# Altium PCB HONGGAN_拼版.PcbDoc (part 2 of 5)
Units mm, origin at the board's own origin, x right, y up, seen from the top; angles counter-clockwise.
Board outline 106.01 x 72.01 mm, 4 copper layers (Top Layer, Mid-Layer 1, Mid-Layer 2, Bottom Layer); 400 components, 0 nets, 1244 pads, 3211 vias.
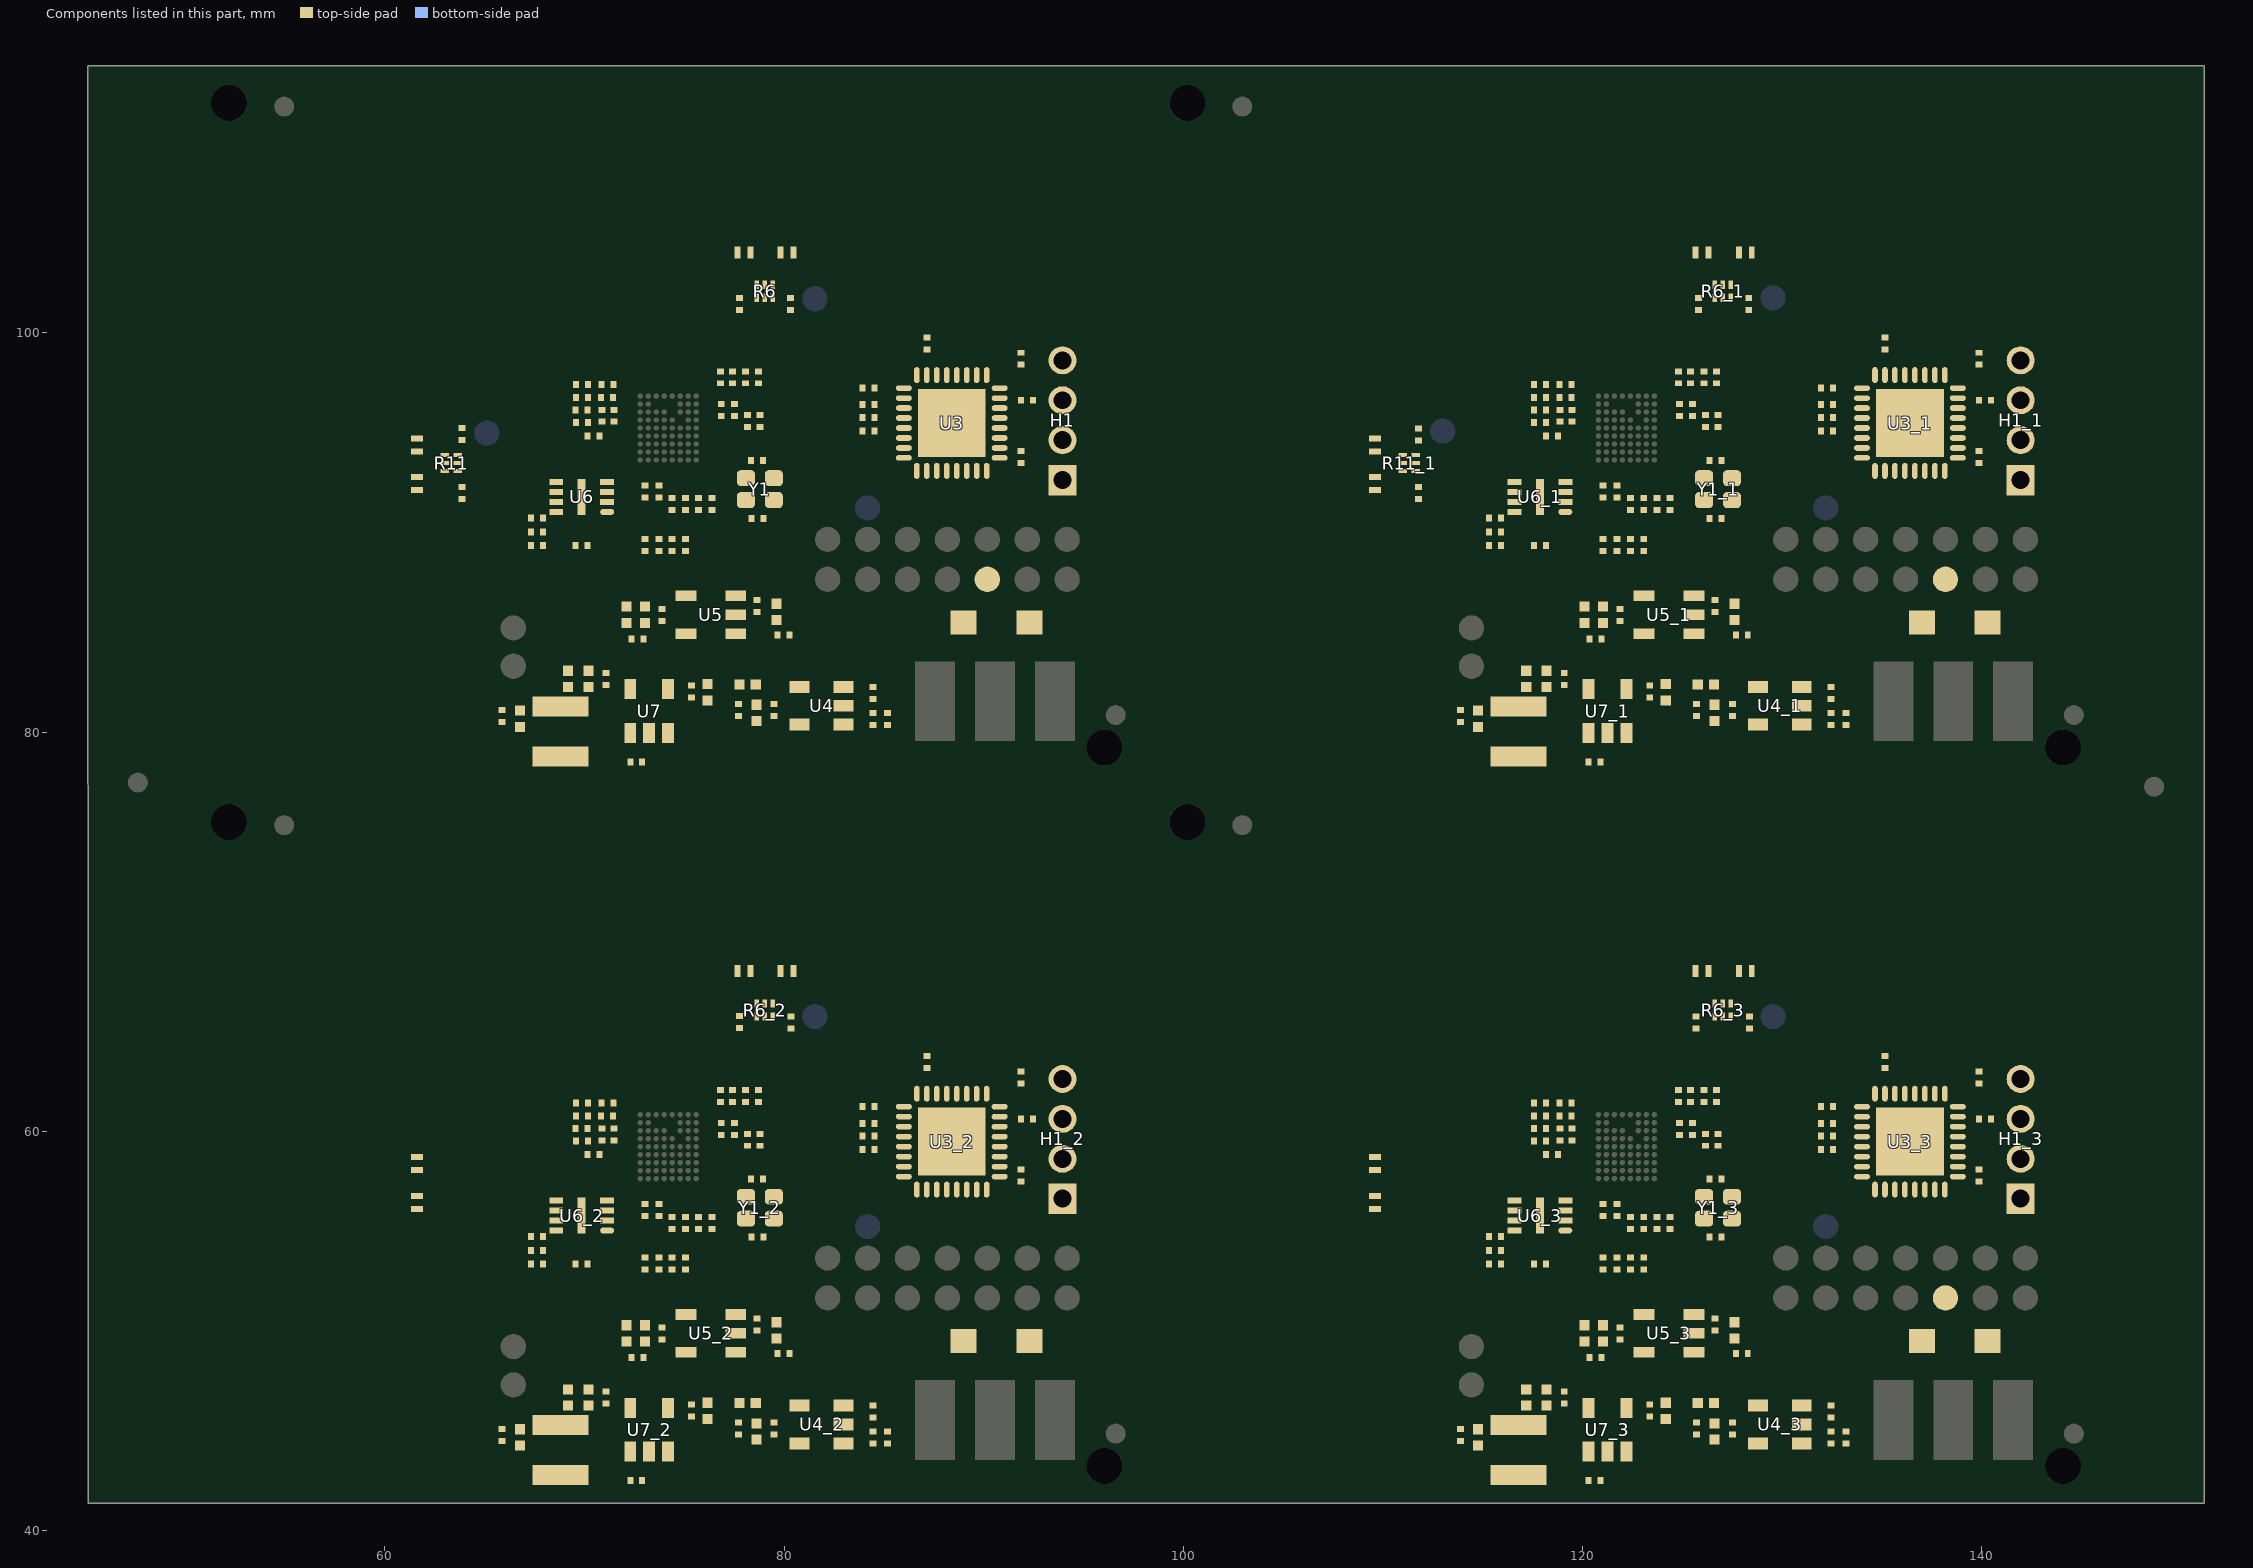
[diagram p4: the components of this part, seen from the top]

## Part data
_1 M_SWCLK M_SWCLK_1 ?: library part 测试点
C1 C1_1 C1_2 C1_3 C2 C2_1 C2_2 C2_3 C3 C3_1 C3_2 C3_3 C4 C4_1 C4_2 C4_3 C5 C5_1 C5_2 C5_3 C6 C6_1 C6_2 C6_3 C7 C7_1 C7_2 C7_3 C8 C8_1 C8_2 C8_3 C9 C9_1 C9_2 C9_3 C10 C10_1 C10_2 C10_3 C11 C11_1 C11_2 C11_3 C12 C12_1 C12_2 C12_3 C13 C13_1 C13_2 C13_3 C14 C14_1 C14_2 C14_3 C15 C15_1 C15_2 C15_3 C16 C16_1 C16_2 C16_3 C17 C17_1 C17_2 C17_3 C18 C18_1 C18_2 C18_3 C19 C19_1 C19_2 C19_3 C20 C20_1 C20_2 C20_3 C21 C21_1 C21_2 C21_3 C22 C22_1 C22_2 C22_3 C23 C23_1 C23_2 C23_3 C24 C24_1 C24_2 C24_3 C25 C25_1 C25_2 C25_3 C26 C26_1 C26_2 C26_3 C27 C27_1 C27_2 C27_3 C28 C28_1 C28_2 C28_3 C29 C29_1 C29_2 C29_3 C34 C34_1 C34_2 C34_3 C35 C35_1 C35_2 C35_3 C36 C36_1 C36_2 C36_3 C37 C37_1 C37_2 C37_3 C38 C38_1 C38_2 C38_3 C39 C39_1 C40 C40_1: library part CAP_0201, Part Name="CAP 0402", Part Number=700011020031, ID=499, Module=0, Part Type=MLCC\SMT\0402\X5R\16V, Priority=S, Process=SMT, Specification=spec
C30 C30_1 C30_2 C30_3 C31 C31_1 C31_2 C31_3: library part CAP_0201, "贴片电容 0201", Part Name="CAP 0402", Part Number=700011020031, ID=499, Module=0, Part Type=MLCC\SMT\0402\X5R\16V, Priority=S, Process=SMT, Specification=spec
C32 C32_1 C32_2 C32_3 C33 C33_1 C33_2 C33_3: library part CAP_0402, "贴片电容 0402"
D1 D1_1 D1_2 D1_3 D2 D2_1 D2_2 D2_3 D3 D3_1 D3_2 D3_3 D4 D4_1 D4_2 D4_3: "极性:双向;反向截止电压(Vrwm):5V;钳位电压:10V;峰值脉冲电流(Ipp):5A;峰值脉冲功率(Ppp):50W;击穿电压(VBR):5.6V;", Clamping Voltage=10V, JLCPCB Part Class="Extended Part", Junction Capacitance=15pF, LCSC Part Name="丝印 PB 双向ESD 5V截止 峰值浪涌电流：5A", Manufacturer=R+O(宏嘉诚), ManufacturerPart=H5VL10B, Operating Temperature=-55℃~+125℃, Peak Pulse Current (Ipp)=5A, Peak Pulse Power Dissipation (Ppp)=50W, Reverse Leakage Current (Ir)=100nA, Reverse Stand-Off Voltage (Vrwm)=5V, Voltage - Breakdown=5.6V, AddInBom=yes, ConvertToPcb=yes, Datasheet=https://item.szlcsc.com/datasheet/H5VL10B/8397194.html, FootprintName=SOD-882_L1.0-W0.6-BI, level of protection="IEC 61000-4-2；IEC 61000-4-5", ModelId=4b1e2a6d6b7148bca7e5c05c116db5a9, ModelName=SOD-882_L1.0-W0.6-BI, ModelTransform=39.37,23.626,0,0,0,0,0,0,0, Number of Channels=单路, Polarity=双向, Supplier=LCSC, Supplier Footprint=DFN1006-2L, SupplierPart=C7420372, Symbol=H5VL10B, Type=ESD
H1 H1_1 H1_2 H1_3: "2.0PH H2.0 1x4Pin 180度 PC2.8 PA3.9 PB2.0 L8.7 6T 常规", JLCPCB Part Class="Extended Part", Manufacturer=XUNPU(讯普), ManufacturerPart=PH2.0-01-04PZD, AddInBom=yes, ConvertToPcb=yes, Datasheet=https://item.szlcsc.com/datasheet/PH2.0-01-04PZD/51736330.html, FootprintName=HDR-TH_4P-P2.00-V-M, LCSC Part Name="2.0PH H2.0 1x4Pin 180度 PC2.8 PA3.9 PB2.0 L8.7 6T 常规", ModelId=951c01626b194dc4b1ce9a294ce0ccd7, ModelName=HDR-TH_4P-P2.00-M-LI-1X4P, ModelTransform=314.96,78.74,0,0,0,0,0,0,-118.11, Supplier=LCSC, Supplier Footprint=插件,P=2mm, SupplierPart=C49286571, Symbol=PH2.0-01-04PZD
L1 L1_1 L1_2 L1_3: library part IND_2.2UH_3X3MM, "ind,2.2uH,1A,smd,3*3*1.5MM", Manufacturer #1=Murata, Article Number=11400007, Geometry.Height=3mm, PCB DECAL=IND-SMD-3X3MM
R1 R1_1 R1_2 R1_3 R2 R2_1 R2_2 R2_3 R3 R3_1 R3_2 R3_3 R4 R4_1 R4_2 R4_3 R5 R5_1 R5_2 R5_3 R7 R7_1 R7_2 R7_3 R8 R8_1 R8_2 R8_3 R9 R9_1 R9_2 R9_3 R10 R10_1 R10_2 R10_3 R12 R12_1 R12_2 R12_3 R13 R13_1 R13_2 R13_3 R14 R14_1 R14_2 R14_3 R16 R16_1 R16_2 R16_3 R17 R17_1 R17_2 R17_3 R18 R18_1 R18_2 R18_3 R19 R19_1 R19_2 R19_3 R21 R21_1 R21_2 R21_3 R25 R25_1 R25_2 R25_3 R26 R26_1 R26_2 R26_3 R27 R27_1 R27_2 R27_3: library part RES_0201, "贴片电阻 0201", PCB DECAL=0201/4
R6 R6_1 R6_2 R6_3 R11 R11_1: "频率:100MHz~6GHz;隔离度:30dB;插入损耗:0.45dB;", Frequency range=100MHz~6GHz, JLCPCB Part Class="Extended Part", LCSC Part Name=5G应用单刀双掷射频开关, Manufacturer=FM(富满), ManufacturerPart=FM8625H, Operating Temperature=-40℃~+90℃, Voltage - Supply=1.62V~3.3V, AddInBom=yes, Circuit=单刀双掷, ConvertToPcb=yes, Datasheet=https://item.szlcsc.com/datasheet/FM8625H/3057622.html, Features=集成控制逻辑, FootprintName=DFN-6_L1.1-W0.7-P0.40-BL, Insertion loss=0.45dB, isolation=30dB, ModelId=eb005b8a66a14fc5b68f6e6c69304dc0, ModelName=DFN-6_L1.1-W0.7-H0.5-P0.40-BL, ModelTransform=44.0944,28.3464,0,0,0,0,0,0,0, P1dB=38dBm, Supplier=LCSC, Supplier Footprint=DFN-6(0.7x1.1), SupplierPart=C2857391, Symbol=FM8625H
R15 R15_1 R15_2 R15_3 R20 R20_1 R20_2 R20_3 R22 R22_1 R22_2 R22_3 R23 R23_1 R23_2 R23_3 R24 R24_1 R24_2 R24_3 R28 R28_1 R28_2 R28_3 R29 R29_1 R29_2 R29_3: library part RES_0402, Material (Resistor)=TF, NUM_RESISTORS=1, PEAK_REFLOW_TEMP=260, Power Rating (Max) (W)=1/20W, PSpiceTemplate="R^@REFDES %1 %2 ?TOLERANCE|R^@REFDES| @VALUE  ?TOLERANCE|\n.model R^@REFDES RES R=1 DEV=@TOLERANCE%|", AMBIQ_PN=AM-01-2915, DISTRIBUTOR=MOUSER, DISTRIBUTOR_PN=667-ERJ-1GNF1003C, FPLIST=RC0201,RC0201_CC, HEIGHT="0.26 MM", LEAD_FREE=Yes, Manufacturer_Datasheet=http://www.mouser.com/ds/2/315/AOA0000C304-1149620.pdf, MFG_NAME=PANASONIC, MFG_PN=ERJ-1GNF1003C, PART_TYPE=0201, PCB_FOOTPRINT_OPTIONS=s0402_l, ROHS=Yes, STATUS=Production, TOL=1%, Type=SMD
U3 U3_1 U3_2 U3_3: "CPU内核:ARM Cortex-M系列;CPU最大主频:72MHz;", JLCPCB Part Class="Extended Part", LCSC Part Name="ARM Cortex-M23 32位微控制器（MCU）", Manufacturer=GigaDevice(兆易创新), ManufacturerPart=GD32E230K8U6, Voltage - Supply=1.8V~3.6V, ADC (Bit)=12bit, AddInBom=yes, ConvertToPcb=yes, CPU Core="ARM Cortex-M系列", CPU Maximum Speed=72MHz, Datasheet=https://item.szlcsc.com/datasheet/GD32E230K8U6/352856.html, FootprintName=QFN-32_L5.0-W5.0-P0.50-BL-EP3.4, ModelId=9cd7b3b2e5534eca85488abae33e32e3, ModelName=QFN-32_L5.0-W5.0-H0.9-P0.50, ModelTransform=197.6374,197.6374,0,90,0,0,-0.789,-0.395,0, Number of I/O=27, Program Memory Type=FLASH, Program Storage Size=64KB, Supplier=LCSC, Supplier Footprint=QFN-32-EP(5x5), SupplierPart=C380536, Symbol=GD32E230K8U6
U4 U4_1 U4_2 U4_3: library part sgm2210-5.0xn5g/tr, "输出极性:正极;工作电压:20V;输出电压:5V;输出电流:300mA;电源纹波抑制比(PSRR):100dB@(1kHz);输出类型:固定;", JLCPCB Part Class="Extended Part", LCSC Part Name="5V 300mA 20V", Manufacturer=SGMICRO(圣邦微), ManufacturerPart=SGM2210-5.0XN5G/TR, Operating Temperature=-40℃~+125℃@(Tj), Output Current=300mA, Output Voltage=5V, Power Supply Rejection Ratio (PSRR)=100dB@(1kHz), standby current=36uA, Voltage - Supply=20V, Voltage Dropout=-, AddInBom=yes, ConvertToPcb=yes, Datasheet=https://item.szlcsc.com/datasheet/SGM2210-5.0XN5G%252FTR/5779520.html, Features=使能控制；短路保护；过流保护；反极性电流保护；输出放电；热关断, FootprintName=SOT-23-5_L2.9-W1.6-P0.95-LS2.8-BL, ModelId=018c57e721114987ae90467fe9f1d259, ModelName=SOT-23-5_L2.9-W1.6-P0.95-LS2.8-BL, ModelTransform=114.96,110.236,0,0,0,0,0,0,0, Noise=48uVrms, Number of Outputs=1, Output Configuration=正极, Output Type=固定, Supplier=LCSC, Supplier Footprint=SOT-23-5, SupplierPart=C5152792, Symbol=SGM2210-5.0XN5G/TR
U5 U5_1 U5_2 U5_3: "输出极性:正极;工作电压:6V;输出电压:800mV~6V;输出电流:500mA;电源纹波抑制比(PSRR):73dB@(100Hz);输出类型:可调;", JLCPCB Part Class="Extended Part", LCSC Part Name="1V 500mA 6V", Manufacturer=ETA(钰泰), ManufacturerPart=ETA5050V0S2F, Operating Temperature=-40℃~+85℃, Output Current=500mA, Output Voltage=800mV~6V, Power Supply Rejection Ratio (PSRR)=73dB@(100Hz), standby current=37uA, Voltage - Supply=6V, Voltage Dropout=370mV@(500mA), AddInBom=yes, ConvertToPcb=yes, Datasheet=https://item.szlcsc.com/datasheet/ETA5050V0S2F/8453546.html, Features=短路保护；使能控制；热关断, FootprintName=SOT-23-5_L3.0-W1.5-P0.95-LS2.8-BL, ModelId=424d41c645fb4cc2a3598f66fad27964, ModelName=SOT-23-5_L3.0-W1.5-P0.95-LS2.8-BL, ModelTransform=118.11,110.236,0,0,0,0,0,0,0, Noise=50uVrms, Number of Outputs=1, Output Configuration=正极, Output Type=可调, Supplier=LCSC, Supplier Footprint=SOT23-5, SupplierPart=C7436029, Symbol=ETA5050V0S2F
U6 U6_1 U6_2 U6_3: library part FLASH_UW, "FLASH"
U7 U7_1 U7_2 U7_3: library part eta3485s2f_c7465518, "功能类型:降压型;工作电压:2.6V~7V;输出电压:600mV~7V;输出电流:1.5A;输出类型:可调;", Frequency - Switching=2MHz, JLCPCB Part Class="Extended Part", LCSC Part Name="降压型 1.5A 2.6V~7V", Manufacturer=ETA(钰泰), ManufacturerPart=ETA3485S2F, Operating Temperature=-40℃~+85℃@(TA), Output Current=1.5A, Output Voltage=600mV~7V, Quiescent Current=20uA, Voltage - Supply=2.6V~7V, AddInBom=yes, ConvertToPcb=yes, Datasheet=https://item.szlcsc.com/datasheet/ETA3485S2F/8507055.html, Features=逐波限流；过流保护；EMI优化(抖频模式), FootprintName=SOT-23-5_L2.9-W1.6-P0.95-LS2.8-BL, Function=降压型, ModelId=018c57e721114987ae90467fe9f1d259, ModelName=SOT-23-5_L2.9-W1.6-P0.95-LS2.8-BL, ModelTransform=114.96,110.236,0,0,0,0,0,0,0, Number of Outputs=1, Output Type=可调, Supplier=LCSC, Supplier Footprint=SOT23-5, SupplierPart=C7465518, Switch tube (built-in/external)=内置, Symbol=ETA3485S2F_C7465518, Synchronous Rectifier=是, Topology=降压式
U8 U8_1 U8_2 U8_3: "极性:单向;反向截止电压(Vrwm):18V;钳位电压:29.2V;峰值脉冲电流(Ipp):6.8A@10/1000us;峰值脉冲功率(Ppp):200W@10/1000us;击穿电压:22.1V;", Clamping Voltage=29.2V, JLCPCB Part Class="Extended Part", LCSC Part Name="单向TVS 18V截止 峰值浪涌电流：6.8A@10/1000us", Manufacturer=R+O(宏嘉诚), ManufacturerPart=SMF18A, Operating Temperature=-55℃~+150℃, Peak Pulse Current (Ipp)=6.8A@10/1000us, Peak Pulse Power Dissipation (Ppp)=200W@10/1000us, Reverse Leakage Current (Ir)=1uA, Reverse Stand-Off Voltage (Vrwm)=18V, Voltage - Breakdown=22.1V, AddInBom=yes, ConvertToPcb=yes, Datasheet=https://item.szlcsc.com/datasheet/SMF18A/20275597.html, FootprintName=SOD-123FL_L2.8-W1.8-LS3.8-R-RD, level of protection="IEC 61000-4-2", ModelId=c9a38256a2424d8b9727054099342ef3, ModelName=SOD-123FL_L2.8-W1.8-LS3.8-RD, ModelTransform=141.732,70.866,0,0,0,0,0,0,0, Polarity=单向, Supplier=LCSC, Supplier Footprint=SOD-123FL, SupplierPart=C19077512, Symbol=SMF18A_C19077512, Type=TVS
Y1 Y1_1 Y1_2 Y1_3: "32MHz XTAL 10PPM", Manufacturer_Name=ECS, Manufacturer_Part_Number=ECS-TXO-2016-33-500-TR, Mouser Part Number=520-TXO-2016-33-500T, Datasheet Link=https://www.mouser.co.uk/datasheet/2/122/ECS-TXO-2016-1601065.pdf, Geometry.Height=0.8mm, Mouser Price/Stock=https://www.mouser.co.uk/ProductDetail/ECS/ECS-TXO-2016-33-500-TR?qs=PzGy0jfpSMtsWDXnTYS%2FFQ%3D%3D, PCB DECAL=ECSTXO2520

## Free pads (board coordinates)
  rect 2x4 smd: BUS(90.567,45.543) BUS(90.567,81.543) BUS(138.567,45.543) BUS(138.567,81.543) GND(93.567,45.543) GND(93.567,81.543) GND(141.567,45.543) GND(141.567,81.543) VIN(87.567,45.543) VIN(87.567,81.543) VIN(135.567,45.543) VIN(135.567,81.543)
  round 1.8 hole 1.8 unplated: MH133(52.197,75.506) MH133(52.197,111.506) MH133(96.057,43.229) MH133(96.057,79.229) MH133(100.197,75.506) MH133(100.197,111.506) MH133(144.057,43.229) MH133(144.057,79.229)
  round 1 smd: MH134(47.625,77.47) MH134(54.953,75.336) MH134(54.953,111.336) MH134(96.609,44.856) MH134(96.609,80.856) MH134(102.953,75.336) MH134(102.953,111.336) MH134(144.609,44.856) MH134(144.609,80.856) MH134(148.629,77.265)

## Via types
v1: diameter 0.3, hole 0.2, Top Layer to Bottom Layer, tented both sides, 3151 vias
v2: diameter 0.5, hole 0.3, Top Layer to Bottom Layer, tented both sides, 48 vias
v3: diameter 0.3, hole 0.2, Top Layer to Bottom Layer, 12 vias

## Nets (pads, with @x,y where several pads share a name; then routed paths per layer and width w, separated by ;. In a path a pad name is that pad's centre, name@x,y a point inside that pad or via, vN(x,y) a via of type N, cw(c..) or ccw(c..) an arc to the next point about the centre after c; other vN are vias at no path point)
pads on no net: 1V5.1 1V5_1.1 1V5_2.1 1V5_3.1 5V.1 5V_1.1 5V_2.1 5V_3.1 12V.1 12V_1.1 12V_2.1 12V_3.1 ?.1 _1.1 C1.1 C1.2 C1_1.1 C1_1.2 C1_2.1 C1_2.2 C1_3.1 C1_3.2 C2.1 C2.2 C2_1.1 C2_1.2 C2_2.1 C2_2.2 C2_3.1 C2_3.2 C3.1 C3.2 C3_1.1 C3_1.2 C3_2.1 C3_2.2 C3_3.1 C3_3.2 C4.1 C4.2 C4_1.1 C4_1.2 C4_2.1 C4_2.2 C4_3.1 C4_3.2 C5.1 C5.2 C5_1.1 C5_1.2 C5_2.1 C5_2.2 C5_3.1 C5_3.2 C6.1 C6.2 C6_1.1 C6_1.2 C6_2.1 C6_2.2 C6_3.1 C6_3.2 C7.1 C7.2 C7_1.1 C7_1.2 C7_2.1 C7_2.2 C7_3.1 C7_3.2 C8.1 C8.2 C8_1.1 C8_1.2 C8_2.1 C8_2.2 C8_3.1 C8_3.2 C9.1 C9.2 C9_1.1 C9_1.2 C9_2.1 C9_2.2 C9_3.1 C9_3.2 C10.1 C10.2 C10_1.1 C10_1.2 C10_2.1 C10_2.2 C10_3.1 C10_3.2 C11.1 C11.2 C11_1.1 C11_1.2 C11_2.1 C11_2.2 C11_3.1 C11_3.2 C12.1 C12.2 C12_1.1 C12_1.2 C12_2.1 C12_2.2 C12_3.1 C12_3.2 C13.1 C13.2 C13_1.1 C13_1.2 C13_2.1 C13_2.2 C13_3.1 C13_3.2 C14.1 C14.2 C14_1.1 C14_1.2 C14_2.1 C14_2.2 C14_3.1 C14_3.2 C15.1 C15.2 C15_1.1 C15_1.2 C15_2.1 C15_2.2 C15_3.1 C15_3.2 C16.1 C16.2 C16_1.1 C16_1.2 C16_2.1 C16_2.2 C16_3.1 C16_3.2 C17.1 C17.2 C17_1.1 C17_1.2 C17_2.1 C17_2.2 C17_3.1 C17_3.2 C18.1 C18.2 C18_1.1 C18_1.2 C18_2.1 C18_2.2 C18_3.1 C18_3.2 C19.1 C19.2 C19_1.1 C19_1.2 C19_2.1 C19_2.2 C19_3.1 C19_3.2 C20.1 C20.2 C20_1.1 C20_1.2 C20_2.1 C20_2.2 C20_3.1 C20_3.2 C21.1 C21.2 C21_1.1 C21_1.2 C21_2.1 C21_2.2 C21_3.1 C21_3.2 C22.1 C22.2 C22_1.1 C22_1.2 C22_2.1 C22_2.2 C22_3.1 C22_3.2 C23.1 C23.2 C23_1.1 C23_1.2 C23_2.1 C23_2.2 C23_3.1 C23_3.2 C24.1 C24.2 C24_1.1 C24_1.2 C24_2.1 C24_2.2 C24_3.1 C24_3.2 C25.1 C25.2 C25_1.1 C25_1.2 C25_2.1 C25_2.2 C25_3.1 C25_3.2 C26.1 C26.2 C26_1.1 C26_1.2 C26_2.1 C26_2.2 C26_3.1 C26_3.2 C27.1 C27.2 C27_1.1 C27_1.2 C27_2.1 C27_2.2 C27_3.1 C27_3.2 C28.1 C28.2 C28_1.1 C28_1.2 C28_2.1 C28_2.2 C28_3.1 C28_3.2 C29.1 C29.2 C29_1.1 C29_1.2 C29_2.1 C29_2.2 C29_3.1 C29_3.2 C30.1 C30.2 C30_1.1 C30_1.2 C30_2.1 C30_2.2 C30_3.1 C30_3.2 C31.1 C31.2 C31_1.1 C31_1.2 C31_2.1 C31_2.2 C31_3.1 C31_3.2 C32.1 C32.2 C32_1.1 C32_1.2 C32_2.1 C32_2.2 C32_3.1 C32_3.2 C33.1 C33.2 C33_1.1 C33_1.2 C33_2.1 C33_2.2 C33_3.1 C33_3.2 C34.1 C34.2 C34_1.1 C34_1.2 C34_2.1 C34_2.2 C34_3.1 C34_3.2 C35.1 C35.2 C35_1.1 C35_1.2 C35_2.1 C35_2.2 C35_3.1 C35_3.2 C36.1 C36.2 C36_1.1 C36_1.2 C36_2.1 C36_2.2 C36_3.1 C36_3.2 C37.1 C37.2 C37_1.1 C37_1.2 C37_2.1 C37_2.2 C37_3.1 C37_3.2 C38.1 C38.2 C38_1.1 C38_1.2 C38_2.1 C38_2.2 C38_3.1 C38_3.2 C39.1 C39.2 C39_1.1 C39_1.2 C40.1 C40.2 C40_1.1 C40_1.2 CLK.1 CLK_1.1 CLK_2.1 CLK_3.1 D1.1 D1.2 D1_1.1 D1_1.2 D1_2.1 D1_2.2 D1_3.1 D1_3.2 D2.1 D2.2 D2_1.1 D2_1.2 D2_2.1 D2_2.2 D2_3.1 D2_3.2 D3.1 D3.2 D3_1.1 D3_1.2 D3_2.1 D3_2.2 D3_3.1 D3_3.2 D4.1 D4.2 D4_1.1 D4_1.2 D4_2.1 D4_2.2 D4_3.1 D4_3.2 DIO.1 DIO_1.1 DIO_2.1 DIO_3.1 EN.1 EN_1.1 EN_2.1 EN_3.1 GND.1 GND_1.1 GND_2.1 GND_3.1 H1.1 H1.2 H1.3 H1.4 H1_1.1 H1_1.2 H1_1.3 H1_1.4 H1_2.1 H1_2.2 H1_2.3 H1_2.4 H1_3.1 H1_3.2 H1_3.3 H1_3.4 INT.1 INT_1.1 INT_2.1 INT_3.1 L1.1 L1.2 L1_1.1 L1_1.2 L1_2.1 L1_2.2 L1_3.1 L1_3.2 LOG.1 LOG_1.1 LOG_2.1 LOG_3.1 M_LOG.1 M_LOG_1.1 M_LOG_2.1 M_LOG_3.1 M_SWCLK.1 M_SWCLK_1.1 M_SWDIO.1 M_SWDIO_1.1 M_SWDIO_2.1 M_SWDIO_3.1 NRST.1 NRST_1.1 NRST_2.1 NRST_3.1 R1.1 R1.2 R1_1.1 R1_1.2 R1_2.1 R1_2.2 R1_3.1 R1_3.2 R2.1 R2.2 R2_1.1 R2_1.2 R2_2.1 R2_2.2 R2_3.1 R2_3.2 R3.1 R3.2 R3_1.1 R3_1.2 R3_2.1 R3_2.2 R3_3.1 R3_3.2 R4.1 R4.2 R4_1.1 R4_1.2 R4_2.1 R4_2.2 R4_3.1 R4_3.2 R5.1 R5.2 R5_1.1 R5_1.2 R5_2.1 R5_2.2 R5_3.1 R5_3.2 R6.1 R6.2 R6.3 R6.4 R6.5 R6.6 R6_1.1 R6_1.2 R6_1.3 R6_1.4 R6_1.5 R6_1.6 R6_2.1 R6_2.2 R6_2.3 R6_2.4 R6_2.5 R6_2.6 R6_3.1 R6_3.2 R6_3.3 R6_3.4 R6_3.5 R6_3.6 R7.1 R7.2 R7_1.1 R7_1.2 R7_2.1 R7_2.2 R7_3.1 R7_3.2 R8.1 R8.2 R8_1.1 R8_1.2 R8_2.1 R8_2.2 R8_3.1 R8_3.2 R9.1 R9.2 R9_1.1 R9_1.2 R9_2.1 R9_2.2 R9_3.1 R9_3.2 R10.1 R10.2 R10_1.1 R10_1.2 R10_2.1 R10_2.2 R10_3.1 R10_3.2 R11.1 R11.2 R11.3 R11.4 R11.5 R11.6 R11_1.1 R11_1.2 R11_1.3 R11_1.4 R11_1.5 R11_1.6 R12.1 R12.2 R12_1.1 R12_1.2 R12_2.1 R12_2.2 R12_3.1 R12_3.2 R13.1 R13.2 R13_1.1 R13_1.2 R13_2.1 R13_2.2 R13_3.1 R13_3.2 R14.1 R14.2 R14_1.1 R14_1.2 R14_2.1 R14_2.2 R14_3.1 R14_3.2 R15.1 R15.2 R15_1.1 R15_1.2 R15_2.1 R15_2.2 R15_3.1 R15_3.2 R16.1 R16.2 R16_1.1 R16_1.2 R16_2.1 R16_2.2 R16_3.1 R16_3.2 R17.1 R17.2 R17_1.1 R17_1.2 R17_2.1 R17_2.2 R17_3.1 R17_3.2 R18.1 R18.2 R18_1.1 R18_1.2 R18_2.1 R18_2.2 R18_3.1 R18_3.2 R19.1 R19.2 R19_1.1 R19_1.2 R19_2.1 R19_2.2 R19_3.1 R19_3.2 R20.1 R20.2 R20_1.1 R20_1.2 R20_2.1 R20_2.2 R20_3.1 R20_3.2 R21.1 R21.2 R21_1.1 R21_1.2 R21_2.1 R21_2.2 R21_3.1 R21_3.2 R22.1 R22.2 R22_1.1 R22_1.2 R22_2.1 R22_2.2 R22_3.1 R22_3.2 R23.1 R23.2 R23_1.1 R23_1.2 R23_2.1 R23_2.2 R23_3.1 R23_3.2 R24.1 R24.2 R24_1.1 R24_1.2 R24_2.1 R24_2.2 R24_3.1 R24_3.2 R25.1 R25.2 R25_1.1 R25_1.2 R25_2.1 R25_2.2 R25_3.1 R25_3.2 R26.1 R26.2 R26_1.1 R26_1.2 R26_2.1 R26_2.2 R26_3.1 R26_3.2 R27.1 R27.2 R27_1.1 R27_1.2 R27_2.1 R27_2.2 R27_3.1 R27_3.2 R28.1 R28.2 R28_1.1 R28_1.2 R28_2.1 R28_2.2 R28_3.1 R28_3.2 R29.1 R29.2 R29_1.1 R29_1.2 R29_2.1 R29_2.2 R29_3.1 R29_3.2 RF0_CTRL.1 RF0_CTRL_1.1 RF0_CTRL_2.1 RF0_CTRL_3.1 RF2_CTRL.1 RF2_CTRL_1.1 RXD.1 RXD_1.1 RXD_2.1 RXD_3.1 TXD.1 TXD_1.1 TXD_2.1 TXD_3.1 U1.A1 U1.A2 U1.A3 U1.A4 U1.A5 U1.A6 U1.A7 U1.A8 U1.A9 U1.B1 U1.B2 U1.B3 U1.B4 U1.B5 U1.B6 U1.B7 U1.B8 U1.B9 U1.C1 U1.C2 U1.C3 U1.C4 U1.C5 U1.C6 U1.C7 U1.C9 U1.D1 U1.D2 U1.D3 U1.D4 U1.D5 U1.D6 U1.D7 U1.D9 U1.E1 U1.E2 U1.E3 U1.E4 U1.E5 U1.E6 U1.E9 U1.F1 U1.F2 U1.F3 U1.F4 U1.F5 U1.F7 U1.F8 U1.F9 U1.G1 U1.G2 U1.G3 U1.G4 U1.G5 U1.G6 U1.G7 U1.G8 U1.G9 U1.H1 U1.H2 U1.H3 U1.H4 U1.H5 U1.H6 U1.H7 U1.H8 U1.H9 U1_1.A1 U1_1.A2 U1_1.A3 U1_1.A4 U1_1.A5 U1_1.A6 U1_1.A7 U1_1.A8 U1_1.A9 U1_1.B1 U1_1.B2 U1_1.B3 U1_1.B4 U1_1.B5 U1_1.B6 U1_1.B7 U1_1.B8 U1_1.B9 U1_1.C1 U1_1.C2 U1_1.C3 U1_1.C4 U1_1.C5 U1_1.C6 U1_1.C7 U1_1.C9 U1_1.D1 U1_1.D2 U1_1.D3 U1_1.D4 U1_1.D5 U1_1.D6 U1_1.D7 U1_1.D9 U1_1.E1 U1_1.E2 U1_1.E3 U1_1.E4 U1_1.E5 U1_1.E6 U1_1.E9 U1_1.F1 U1_1.F2 U1_1.F3 U1_1.F4 U1_1.F5 U1_1.F7 U1_1.F8 U1_1.F9 U1_1.G1 U1_1.G2 U1_1.G3 U1_1.G4 U1_1.G5 U1_1.G6 U1_1.G7 U1_1.G8 U1_1.G9 U1_1.H1 U1_1.H2 U1_1.H3 U1_1.H4 U1_1.H5 U1_1.H6 U1_1.H7 U1_1.H8 U1_1.H9 U1_2.A1 U1_2.A2 U1_2.A3 U1_2.A4 U1_2.A5 U1_2.A6 U1_2.A7 U1_2.A8 U1_2.A9 U1_2.B1 U1_2.B2 U1_2.B3 U1_2.B4 U1_2.B5 U1_2.B6 U1_2.B7 U1_2.B8 U1_2.B9 U1_2.C1 U1_2.C2 U1_2.C3 U1_2.C4 U1_2.C5 U1_2.C6 U1_2.C7 U1_2.C9 U1_2.D1 U1_2.D2 U1_2.D3 U1_2.D4 U1_2.D5 U1_2.D6 U1_2.D7 U1_2.D9 U1_2.E1 U1_2.E2 U1_2.E3 U1_2.E4 U1_2.E5 U1_2.E6 U1_2.E9 U1_2.F1 U1_2.F2 U1_2.F3 U1_2.F4 U1_2.F5 U1_2.F7 U1_2.F8 U1_2.F9 U1_2.G1 U1_2.G2 U1_2.G3 U1_2.G4 U1_2.G5 U1_2.G6 U1_2.G7 U1_2.G8 U1_2.G9 U1_2.H1 U1_2.H2 U1_2.H3 U1_2.H4 U1_2.H5 U1_2.H6 U1_2.H7 U1_2.H8 U1_2.H9 U1_3.A1 U1_3.A2 U1_3.A3 U1_3.A4 U1_3.A5 U1_3.A6 U1_3.A7 U1_3.A8 U1_3.A9 U1_3.B1 U1_3.B2 U1_3.B3 U1_3.B4 U1_3.B5 U1_3.B6 U1_3.B7 U1_3.B8 U1_3.B9 U1_3.C1 U1_3.C2 U1_3.C3 U1_3.C4 U1_3.C5 U1_3.C6 U1_3.C7 U1_3.C9 U1_3.D1 U1_3.D2 U1_3.D3 U1_3.D4 U1_3.D5 U1_3.D6 U1_3.D7 U1_3.D9 U1_3.E1 U1_3.E2 U1_3.E3 U1_3.E4 U1_3.E5 U1_3.E6 U1_3.E9 U1_3.F1 U1_3.F2 U1_3.F3 U1_3.F4 U1_3.F5 U1_3.F7 U1_3.F8 U1_3.F9 U1_3.G1 U1_3.G2 U1_3.G3 U1_3.G4 U1_3.G5 U1_3.G6 U1_3.G7 U1_3.G8 U1_3.G9 U1_3.H1 U1_3.H2 U1_3.H3 U1_3.H4 U1_3.H5 U1_3.H6 U1_3.H7 U1_3.H8 U1_3.H9 U3.1 U3.2 U3.3 U3.4 U3.5 U3.6 U3.7 U3.8 U3.9 U3.10 U3.11 U3.12 U3.13 U3.14 U3.15 U3.16 U3.17 U3.18 U3.19 U3.20 U3.21 U3.22 U3.23 U3.24 U3.25 U3.26 U3.27 U3.28 U3.29 U3.30 U3.31 U3.32 U3.33 U3_1.1 U3_1.2 U3_1.3 U3_1.4 U3_1.5 U3_1.6 U3_1.7 U3_1.8 U3_1.9 U3_1.10 U3_1.11 U3_1.12 U3_1.13 U3_1.14 U3_1.15 U3_1.16 U3_1.17 U3_1.18 U3_1.19 U3_1.20 U3_1.21 U3_1.22 U3_1.23 U3_1.24 U3_1.25 U3_1.26 U3_1.27 U3_1.28 U3_1.29 U3_1.30 U3_1.31 U3_1.32 U3_1.33 U3_2.1 U3_2.2 U3_2.3 U3_2.4 U3_2.5 U3_2.6 U3_2.7 U3_2.8 U3_2.9 U3_2.10 U3_2.11 U3_2.12 U3_2.13 U3_2.14 U3_2.15 U3_2.16 U3_2.17 U3_2.18 U3_2.19 U3_2.20 U3_2.21 U3_2.22 U3_2.23 U3_2.24 U3_2.25 U3_2.26 U3_2.27 U3_2.28 U3_2.29 U3_2.30 U3_2.31 U3_2.32 U3_2.33 U3_3.1 U3_3.2 U3_3.3 U3_3.4 U3_3.5 U3_3.6 U3_3.7 U3_3.8 U3_3.9 U3_3.10 U3_3.11 U3_3.12 U3_3.13 U3_3.14 U3_3.15 U3_3.16 U3_3.17 U3_3.18 U3_3.19 U3_3.20 U3_3.21 U3_3.22 U3_3.23 U3_3.24 U3_3.25 U3_3.26 U3_3.27 U3_3.28 U3_3.29 U3_3.30 U3_3.31 U3_3.32 U3_3.33 U4.1 U4.2 U4.3 U4.4 U4.5 U4_1.1 U4_1.2 U4_1.3 U4_1.4 U4_1.5 U4_2.1 U4_2.2 U4_2.3 U4_2.4 U4_2.5 U4_3.1 U4_3.2 U4_3.3 U4_3.4 U4_3.5 U5.1 U5.2 U5.3 U5.4 U5.5 U5_1.1 U5_1.2 U5_1.3 U5_1.4 U5_1.5 U5_2.1 U5_2.2 U5_2.3 U5_2.4 U5_2.5 U5_3.1 U5_3.2 U5_3.3 U5_3.4 U5_3.5 U6.1 U6.2 U6.3 U6.4 U6.5 U6.6 U6.7 U6.8 U6.9 U6_1.1 U6_1.2 U6_1.3 U6_1.4 U6_1.5 U6_1.6 U6_1.7 U6_1.8 U6_1.9 U6_2.1 U6_2.2 U6_2.3 U6_2.4 U6_2.5 U6_2.6 U6_2.7 U6_2.8 U6_2.9 U6_3.1 U6_3.2 U6_3.3 U6_3.4 U6_3.5 U6_3.6 U6_3.7 U6_3.8 U6_3.9 U7.1 U7.2 U7.3 U7.4 U7.5 U7_1.1 U7_1.2 U7_1.3 U7_1.4 U7_1.5 U7_2.1 U7_2.2 U7_2.3 U7_2.4 U7_2.5 U7_3.1 U7_3.2 U7_3.3 U7_3.4 U7_3.5 U8.1 U8.2 U8_1.1 U8_1.2 U8_2.1 U8_2.2 U8_3.1 U8_3.2 VCC.1 VCC_1.1 VCC_2.1 VCC_3.1 Y1.1 Y1.2 Y1.3 Y1.4 Y1_1.1 Y1_1.2 Y1_1.3 Y1_1.4 Y1_2.1 Y1_2.2 Y1_2.3 Y1_2.4 Y1_3.1 Y1_3.2 Y1_3.3 Y1_3.4